# Altium PCB SuperCapCtrl.PcbDoc (part 2 of 2)
Units mil, origin at the board's own origin, x right, y up, seen from the top; angles counter-clockwise.
Board outline 2882.05 x 1582.83 mil, 4 copper layers (Top Layer, Layer 1, Layer 2, Bottom Layer), stack 23.756 mil thick; 102 components, 59 nets, 335 pads, 336 vias.
Unrouted connection lines stored in the file: 2.
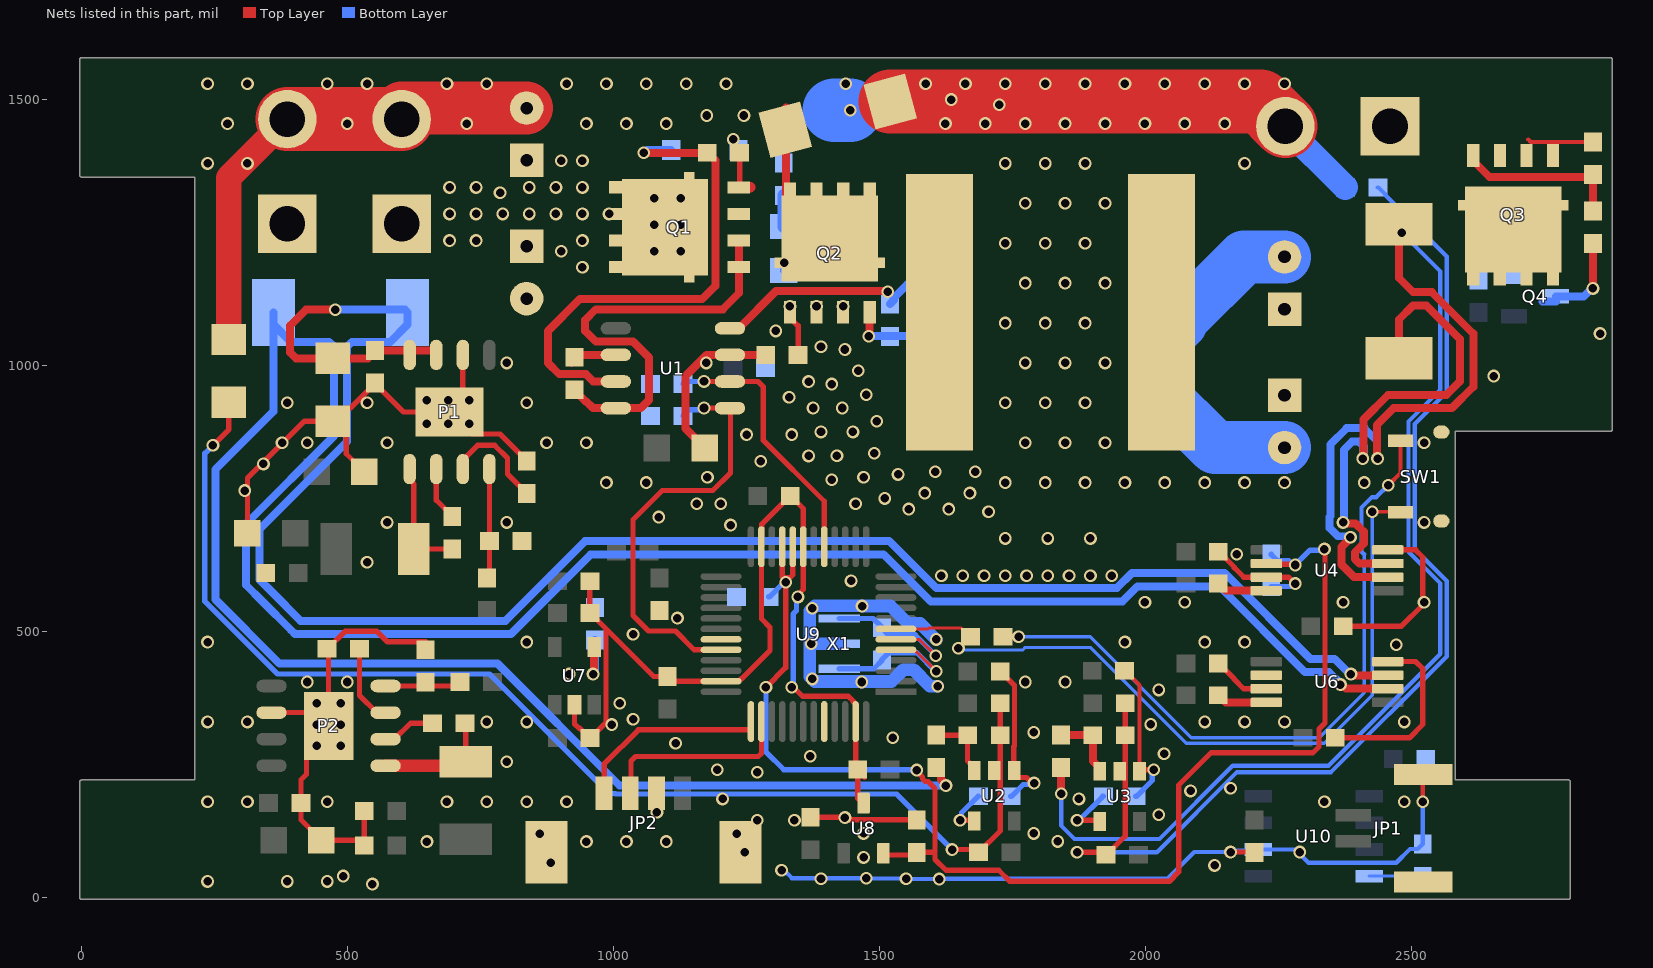
[diagram p4: the nets of this part, all layers, seen from the top]

## Via types
v1: diameter 24, hole 16, Top Layer to Bottom Layer, tented both sides, 336 vias

## Nets (pads, with @x,y where several pads share a name; then routed paths per layer and width w, separated by ;. In a path a pad name is that pad's centre, name@x,y a point inside that pad or via, vN(x,y) a via of type N, cw(c..) or ccw(c..) an arc to the next point about the centre after c; other vN are vias at no path point) (continued)
GND: C1.1 C2.1 C4.1 C5.1 C6.1 C8.1 C11.1 C12.1 C13.1 C15.1 C16.1 C17.1 C18.1 C19.1 C20.1 C21.1 C22.1 C23.1 C24.1 C25.1 C26.1 C27.1 C28.1 C29.1 C30.1 C31.1 C32.2 C33.2 C34.2 C35.2 C36.2 C37.2 C38.2 C39.2 C40.1 C43.2 JP1.0 JP2.0 JP2.3 P1.6 P1.9 P2.6 P2.9 Q4.2 R1.2 R3.2 R7.1 R10.1 R15.2 R20.2 R21.2 R23.2 R24.2 R28.1 R29.1 SW1.1 SW1.SH U1.7 U2.2 U3.2 U4.4 U4.7 U6.4 U6.6 U6.7 U7.2 U8.3 U9.19 U9.23 U9.35 U9.47 U10.2 X1.2 | length 13241
  Top Layer w6: JP2.0@1238.9,65.12 JP2.0@1238.9,84.8 v1(1246.54,84.8) ; C40.1@1732.05,489.8 v1(1761.54,489.8)
  Top Layer w8: v1(2456.54,774.8) 2479.76,798.03 SW1.1@2479.76,858.08 ; v1(2521.54,179.8) 2521.54,230.24 JP1.0@2522.48,231.18
  Top Layer w10: v1(246.54,849.8) 276.54,879.8 R1.2@276.54,930.75 ; C5.1@311.54,684.8 311.54,788.18 418.74,895.39 C1.1@471.54,895.39 ; P2.6@356.75,347.3 439.04,347.3 P2.9@464.04,322.3 ; v1(441.54,364.8) P2.9@464.04,342.3 ; C15.1@531.24,162.3 C16.1@531.24,97.3 521.24,107.3 C12.1@450.68,107.3 412.27,145.72 C13.1@412.27,177.3 412.27,221.03 422.58,231.34 422.58,280.85 P2.9@464.04,322.3 ; C4.1@531.54,799.8 497.39,833.95 497.39,870.86 472.87,895.39 C1.1@471.54,895.39 ; C2.1@551.54,966.86 C2.1@551.54,965.88 ; R10.1@646.54,480.32 574.76,480.32 555.02,500.06 494.98,500.06 462.22,467.3 C21.1@461.24,467.3 464.04,464.51 P2.9@464.04,342.3 ; P1.6@716.54,1019.8 716.54,937.52 P1.9@691.54,912.52 ; C8.1@836.54,820.32 836.54,821.3 786.77,871.06 732.99,871.06 P1.9@691.54,912.52 ; U7.2@926.54,362.1 926.54,326.14 934.84,317.83 936.78,317.83 942.64,311.97 942.64,311.13 954.37,299.4 C22.1@955.36,299.4 956.34,299.4 985.84,328.9 985.84,504.9 ; C24.1@955.36,594.4 955.36,535.39 985.84,504.9 ; C32.2@1101.54,406.22 U9.35@1202.15,406.22 1235.11,406.22 1239.64,410.75 1240.76,410.75 1294.22,464.21 1294.22,507.49 1277.95,523.75 U9.23@1277.95,659.19 1278.39,659.63 1278.39,701.15 1319.33,742.09 1319.33,743.07 1331.06,754.8 C33.2@1332.04,754.8 1333.03,754.8 1356.69,731.14 U9.19@1356.69,659.19 1356.69,578.75 1346.54,568.59 v1(1346.54,564.8) ; C32.2@1101.54,415.31 1075.43,415.31 985.84,504.9 ; v1(1335.04,394.8) 1338.82,394.8 1355.72,377.9 1441.71,377.9 1450.58,369.03 1450.58,367.91 1455.12,363.37 U9.47@1455.12,330.41 C35.2@1455.12,243.86 ; C30.1@1370,150.52 v1@1435,150.52 ; v1@1430,145.52 1565,145.52 C31.1@1570,140.52 ; C35.2@1458.98,240 1458.98,186.14 1470,175.12 U8.3@1470,167.24 ; C35.2@1471.69,225.16 C35.2@1471.69,228.27 ; v1(1636.54,89.8) 1681.02,89.8 C17.1@1686.02,84.8 ; C17.1@1687,84.8 1727.05,124.85 C25.1@1727.05,364.8 ; v1(1871.54,84.8) 1921.02,84.8 C18.1@1926.02,79.8 ; C18.1@1927,79.8 1962.05,114.85 C29.1@1962.05,364.8 ; C26.1@2137.05,439.8 2138.03,439.8 2167.31,410.53 2167.31,409.55 2184.85,392.01 U6.7@2227.36,392.01 ; C28.1@2137.05,649.8 2138.03,649.8 2167.31,620.53 2167.31,619.55 2184.85,602.01 U4.7@2227.36,602.01 2269.21,602.01 2281.42,589.8 v1(2281.54,589.8) ; v1(2160,85) 2204.49,85 C37.2@2205,84.49 ; C20.1@2357.05,299.8 2496.54,299.8 2521.54,324.8 2521.54,429.8 2508.15,443.19 U6.4@2455.71,443.19 ; C19.1@2372.05,509.8 2481.54,509.8 2521.54,549.8 2521.54,639.8 2508.15,653.19 U4.4@2455.71,653.19 ; P2.9@464.04,322.3 P2.9@464.04,342.3 ; C1.1@471.54,895.39 496.06,919.92 505.58,919.92 C2.1@551.54,965.88 ; C2.1@551.54,965.88 604.89,912.52 P1.9@691.54,912.52
  Top Layer w15: C11.1@1171.54,844.8 1135,881.34 1135,980 1174.8,1019.8 R3.2@1280.04,1019.8
  Bottom Layer w6: v1(1761.54,489.8) 1896.54,489.8 2086.54,299.8 2326.54,299.8 2411.54,384.8 2411.54,644.8
  Bottom Layer w8: v1(1315.93,50.94) 1320.26,50.94 1335.2,36 1390,36 v1(1475,36) ; v1@1475.39,35 1475.89,35.5 1549.5,35.5 1550.42,34.58 1611.79,34.58 v1(1612.21,34.16) ; v1@1612.21,34.8 2041.54,34.8 2091.73,85 v1(2160,85) ; v1(1871.54,84.8) 2021.54,84.8 2172.04,235.3 2349.01,235.3 2566.54,452.83 2566.54,594.8 2506.54,654.8 2506.54,889.8 2566.54,949.8 2566.54,1204.8 2526.54,1244.8 2526.54,1245.31 2450.76,1321.09 2450.76,1322.07 2438.03,1334.8 R24.2@2437.04,1334.8 ; v1@2162.4,87.4 2209.8,87.4 U10.2@2212.2,89.8 2281.54,89.8 2306.54,64.8 2471.54,64.8 2497.49,90.76 2511.98,90.76 R21.2@2521.54,100.31 v1(2521.54,179.8) ; 2411.54,644.8 2406.54,649.8 2406.54,733.09 2425.86,752.41 2434.15,752.41 v1(2456.54,774.8)
  Bottom Layer w10: v1(246.54,849.8) 231.54,834.8 231.54,556.47 368.2,419.8 766.54,419.8 991.34,195 1003,195 1003.88,194.12 1532.22,194.12 v1(1636.54,89.8) ; v1(1335.04,394.8) 1337.71,397.48 1337.71,532.8 1343.86,538.95 1343.86,562.12 v1(1346.54,564.8) ; C38.2@2236.54,584.29 2272.24,584.29 2277.75,589.8 v1(2281.54,589.8)
  Bottom Layer w24: v1(1371.54,476.93) X1.2@1424.41,476.93 ; v1(1467.16,547.69) 1520.71,547.69 1553.83,514.57 1576.77,514.57 v1(1606.54,484.8) ; v1@1470.41,548.05 1378.41,548.05 v1(1373.73,543.36) 1369.04,538.67 1369.04,415.18 v1(1373.73,410.5) 1378.41,405.81 1465.53,405.81 v1(1466.54,404.8) 1467.54,405.81 1522.54,405.81 1544.59,427.86 1564.48,427.86 1578.54,413.8 1578.54,413.21 1594.94,396.8 v1(1609.54,396.8)
  other v1: 546.54,24.8 236.54,29.8 386.54,29.8 461.54,29.8 1390,35 1550,35 491.54,39.8 2130,60 881.54,64.8 1470,75 2290,85 649.04,104.8 949.04,104.8 1024.04,104.8 1099.04,104.8 1835,105 861.54,119.8 1231.54,119.8 1470,120 1790,120 1270,145 1340,145 1435,150 2025,155 1081.54,159.8 236.54,179.8 311.54,179.8 461.54,179.8 686.54,179.8 761.54,179.8 836.54,179.8 911.54,179.8 2336.54,179.8 2486.54,179.8 1205,185 1875,185 2085,200 2160,205 1270,235 1195,240 799.04,254.8 1370,265 2035,270 441.54,284.8 486.54,284.8 1116.54,289.8 1525,300 1790,310 441.54,324.8 486.54,324.8 996.54,324.8 2010,325 236.54,329.8 311.54,329.8 761.54,329.8 836.54,329.8 2111.54,329.8 2186.54,329.8 2261.54,329.8 2486.54,329.8 1036.54,334.8 486.54,364.8 1011.54,364.8 2025,390 424.04,404.8 499.04,404.8 1774.04,404.8 1849.04,404.8 916.54,419.8 2471.54,474.8 236.54,479.8 836.54,479.8 1961.54,479.8 2111.54,479.8 2186.54,479.8 1036.54,494.8 1120,525 1999.04,554.8 2074.04,554.8 2371.54,554.8 2524.04,554.8 1446.54,594.8 1616.54,604.8 1656.54,604.8 1696.54,604.8 1736.54,604.8 1776.54,604.8 1816.54,604.8 1856.54,604.8 1896.54,604.8 1936.54,604.8 536.54,629.8 2171.54,644.8 1736.54,674.8 1816.54,674.8 1896.54,674.8 1220,700 574.04,704.8 799.04,704.8 2524.04,704.8 1085,715 1156.54,739.8 1201.54,739.8 306.54,764.8 986.54,779.8 1061.54,779.8 2411.54,779.8 1176.54,789.8 341.54,814.8 1276.54,819.8 376.54,854.8 424.04,854.8 574.04,854.8 874.04,854.8 949.04,854.8 2524.04,854.8 1250,870 649.04,890.02 689.04,890.02 729.04,890.02 386.54,929.8 536.54,929.8 836.54,929.8 649.04,935.02 689.04,935.02 729.04,935.02 2655,980 799.04,1004.8 1174.04,1004.8 2855,1060
HDRV: D1.K R2.2 U1.3 | length 981.6
  Top Layer w15: U1.3@1004.25,969.8 961.73,969.8 948.03,983.5 897.83,983.5 876.54,1004.8 876.54,1064.8 936.54,1124.8 1166.54,1124.8 1191.54,1149.8 1191.54,1385.28 R2.2@1177.01,1399.8 ; v1(1056.54,1399.8) R2.2@1176.03,1399.8
  Bottom Layer w15: v1(1056.54,1399.8) 1058.97,1399.8 1063.97,1404.8 D1.K@1108.15,1404.8
HG: D1.A Q1.G R2.1 | length 141.8
  Top Layer w10: v1(1225,1425) 1225,1411.54 1236.73,1399.8 R2.1@1237.05,1399.8 1237.05,1336.36 1235.69,1335 Q1.G@1235.5,1334.8
  Top Layer w20: Q1.G@1235.69,1335 1257.17,1335
  Bottom Layer w10: v1(1225,1425) 1225,1414.73 D1.A@1234.93,1404.8
IB_N: C1.2 C2.2 C41.1 C42.1 P1.7 P1.8 Q1.D R4.2 U6.3 XT1.1 | length 3581.7
  Top Layer w15: v1(476.54,1104.8) 421.54,1104.8 391.54,1074.8 391.54,1024.8 402.84,1013.5 C1.2@471.54,1013.5 538.14,1013.5 551.54,1026.9 C2.2@551.54,1027.88 662.55,1027.88 666.54,1023.9 P1.7@666.54,1019.8 ; v1(2386.54,419.8) 2388.26,418.08 2394.62,418.08 2395.4,417.3 2455.41,417.3 U6.3@2455.71,417.6
  Bottom Layer w15: v1(476.54,1104.8) 607.52,1104.8 R4.2@612.52,1099.8 612.52,1076.81 580.02,1044.31 507.83,1044.31 499.04,1035.52 499.04,941.7 499.04,856.95 334.21,692.13 334.21,597.13 356.54,574.8 411.54,519.8 796.54,519.8 946.54,669.8 1518.3,669.8 1606.8,581.3 1946.27,581.3 1974.77,609.8 2149.01,609.8 2310.53,448.29 2355.93,448.29 2384.41,419.8 v1(2386.54,419.8)
  other v1: 941.54,1184.8 901.54,1214.8 1076.54,1214.8 1126.54,1214.8 691.54,1234.8 741.54,1234.8 941.54,1234.8 1076.54,1264.8 1126.54,1264.8 691.54,1284.8 741.54,1284.8 791.54,1284.8 841.54,1284.8 891.54,1284.8 941.54,1284.8 991.54,1284.8 1076.54,1314.8 1126.54,1314.8 786.54,1324.8 691.54,1334.8 741.54,1334.8 841.54,1334.8 891.54,1334.8 941.54,1334.8 901.54,1384.8 941.54,1384.8
IB_P: R4.1 R14.1 U6.2 XT2.1 | length 5169
  Top Layer w15: R14.1@1606.06,243.78 1615.77,234.07 1615.77,221.67 1625,212.44 v1(1625,210) ; v1(2366.74,400) 2369.17,400 2376.87,392.3 2455.41,392.3 U6.2@2455.71,392.01
  Bottom Layer w15: R4.1@360.56,1099.8 R4.1@360.56,1076.81 ; v1(1625,210) 1624.38,210.62 1010.72,210.62 781.54,439.8 371.54,439.8 251.54,559.8 251.54,804.8 360.56,913.82 R4.1@360.56,1076.81 ; v1(2366.74,400) 2366.74,402.13 2345.58,423.29 2300.17,423.29 2138.66,584.8 1985.12,584.8 1956.62,556.3 1596.45,556.3 1507.95,644.8 956.89,644.8 806.89,494.8 401.18,494.8 393.86,502.13 338.86,557.13 309.21,586.77 309.21,702.48 474.04,867.31 474.04,952.06 474.04,1035.52 465.25,1044.31 393.06,1044.31 R4.1@360.56,1076.81
IC_N: C9.1 C10.1 L2.2 R6.1 U4.3 | length 1033.3
  Top Layer w15: v1(2371.54,704.8) 2373.26,703.08 2395.02,703.08 2410.6,687.5 2410.6,665.41 2393.71,648.52 2393.71,636.09 2402.5,627.3 2455.41,627.3 U4.3@2455.71,627.6 ; v1(2408.54,824.8) 2410.04,826.3 2410.04,898.3 2456.54,944.8 2566.17,944.8 2591.54,970.17 2591.54,1049.45 2528.18,1112.8 2503.27,1112.8 2476.53,1086.06 R6.1@2476.53,1013.82 ; R6.1@2476.53,992.84 2495.81,992.84 R6.1@2528.31,1025.34
  Bottom Layer w15: v1(2371.54,704.8) 2373.04,706.3 2373.04,841.3 2388.82,857.09 2401.25,857.09 2410.04,848.3 2410.04,826.3 v1(2408.54,824.8)
IC_P: Q3.D R6.2 R19.1 U4.2 | length 3002.7
  Top Layer w15: v1(1841.54,194.8) R19.1@1841.54,244.29 ; v1(2385.6,677.15) 2385.6,675.76 2368.71,658.87 2368.71,625.73 2392.14,602.3 U4.2@2463.03,602.3 ; v1(2436.54,824.8) 2435.04,826.3 2435.04,887.95 2466.89,919.8 2576.52,919.8 2616.54,959.82 2616.54,1059.8 2538.54,1137.8 2503.54,1137.8 2476.54,1164.8 R6.2@2476.54,1249.8
  Bottom Layer w8: v1(1841.54,194.8) 1841.54,134.8 1866.54,109.8 2026.54,109.8 2164.04,247.3 2344.04,247.3 2554.54,457.8 2554.54,589.83 2494.54,649.83 2494.54,894.77 2554.54,954.77 2554.54,1176.8 v1(2481.54,1249.8)
  Bottom Layer w15: v1(2385.6,677.15) 2383.88,678.87 2362.11,678.87 2346.54,694.45 2346.54,715.16 2348.04,716.66 2348.04,851.66 2378.47,882.09 2411.6,882.09 2435.04,858.66 2435.04,826.3 v1(2436.54,824.8)
LDRV: D2.K R8.2 U1.8 | length 437.4
  Top Layer w15: U1.8@1218.82,1069.8 1235.55,1069.8 1305.55,1139.8 1514.54,1139.8 v1(1515.54,1138.8)
  Bottom Layer w15: v1(1515.54,1138.8) R8.2@1527.13,1127.21 ; R8.2@1520,1115.51 1527.13,1122.64 R8.2@1527.13,1127.21 ; D2.K@1596.78,1152.83 1552.75,1152.83 R8.2@1527.13,1127.21
LG: D2.A Q2.G R8.1 | length 174.2
  Top Layer w15: v1(1480,1055) 1480.77,1055.77 1480.77,1099.04 Q2.G@1481.54,1099.8
  Bottom Layer w15: v1(1480,1055) 1566.26,1055 1595.21,1026.05 D2.A@1596.78,1026.05
MSW: C7.1 D3.K L2.1 Q1.S Q2.D Rs.2 U1.4 | length 1188.3
  Top Layer w10: Q1.S@1225.66,1284.8 Q1.S@1235.5,1284.8 Q1.S@1245.33,1284.8 ; L2.1@1555.28,973.44 1612.88,1031.04 L2.1@1612.88,1099.8 L2.1@1626.54,1113.46
  Top Layer w15: C7.1@926.54,954.29 926.54,953.3 946.65,933.19 947.63,933.19 961.02,919.8 U1.4@1004.25,919.8 1051.54,919.8 1066.54,934.8 1066.54,1014.8 1036.54,1044.8 966.54,1044.8 946.54,1064.8 946.54,1085.66 966.54,1105.66 1205.31,1105.66 1235.5,1135.84 Q1.S@1235.5,1184.8 Q1.S@1235.5,1234.8 ; Q2.D@1324.52,1311.97 D3.K@1324.52,1484.8
  Bottom Layer w15: Rs.2@1320,1178.66 1321.14,1179.8 v1(1321.14,1193.1)
NetC3_1: C3.1 L1.1 P1.1 | length 225.8
  Top Layer w10: P1.1@616.54,805.24 616.54,784.82 624.37,776.98 L1.1@624.37,654.8 C3.1@696.54,654.8
NetC3_2: C3.2 P1.2 | length 101.8
  Top Layer w10: P1.2@666.54,805.24 666.54,746.81 696.54,716.81 C3.2@696.54,715.83
NetC7_2: C7.2 U1.2 | length 93.6
  Top Layer w8: C7.2@921.54,1000.83 921.54,1001.81 C7.2@930.79,1011.06
  Top Layer w15: C7.2@926.54,1015.31 931.03,1019.8 U1.2@1004.25,1019.8
NetC8_2: C8.2 P1.3 | length 203.6
  Top Layer w10: P1.3@716.54,805.24 716.54,821.97 744.37,849.8 776.54,849.8 800.67,825.67 800.67,796.15 836.54,760.28 C8.2@836.54,759.29
NetC14_1: C14.1 L3.1 P2.1 | length 220.7
  Top Layer w10: C14.1@720.77,327.3 721.75,326.32 L3.1@721.75,255.14
  Top Layer w24: P2.1@571.32,247.3 571.51,247.49 714.11,247.49 L3.1@717.84,251.22
NetC14_2: C14.2 P2.2 | length 100.9
  Top Layer w10: P2.2@571.32,297.3 588.05,297.3 618.05,327.3 C14.2@659.74,327.3
NetC21_2: C21.2 P2.3 | length 150.1
  Top Layer w10: C21.2@522.26,467.3 522.26,379.63 554.59,347.3 P2.3@571.32,347.3
NetC27_2: C27.2 U7.4 | length 117
  Top Layer w15: v1(961.54,419.8) 962.74,421 962.74,469.17 U7.4@963.94,470.37
  Bottom Layer w15: v1(961.54,419.8) 961.54,422.24 964.84,425.55 C27.2@964.84,483.89
NetC40_2: C40.2 SW1.2 U9.7 | length 1469.9
  Top Layer w6: U9.7@1530.92,504.65 1590.79,504.65 1592.32,506.17 1653.67,506.17 C40.2@1670.04,489.8 ; v1(1648.49,468.25) C40.2@1670.04,489.8 ; C40.2@1671.03,489.8 C40.2@1670.04,489.8 ; v1(2426.54,724.8) 2479.18,724.8 SW1.2@2479.76,724.22
  Bottom Layer w6: v1(1648.49,468.25) 1651.93,464.8 1768.97,464.8 1773.97,469.8 1896.54,469.8 2076.54,289.8 2336.54,289.8 2426.54,379.8 v1(2426.54,724.8)
NetCs_1: Cs.1 Rs.1 | length 58.1
  Bottom Layer w24: Rs.1@1320,1261.34 Cs.1@1320,1319.48
NetP1_4: P1.4 R5.1 R7.2 | length 206.8
  Top Layer w10: R5.1@762.04,600.32 766.54,604.81 R7.2@766.54,669.8 P1.4@766.54,805.24
NetP2_4: P2.4 R9.1 R10.2 | length 142.8
  Top Layer w10: P2.4@571.32,397.3 703.52,397.3 R9.1@711.02,404.8
NetQ3_G: Q3.G R25.1 R26.2 | length 318.2
  Top Layer w15: Q3.G@2616.54,1394.8 2616.54,1384.97 2646.7,1354.8 2837.05,1354.8 R25.1@2841.54,1359.29 R26.2@2841.54,1290.31
NetQ4_3: Q4.3 R26.1 | length 185.3
  Top Layer w15: v1(2841.54,1144.8) R26.1@2841.54,1229.29
  Bottom Layer w15: 2746.93,1119.89 Q4.3@2771.93,1119.89 ; Q4.3@2771.93,1129.89 2824.19,1129.89 2839.1,1144.8 v1(2841.54,1144.8)
NetR11_1: R11.1 R12.2 U2.1 | length 379
  Top Layer w8: R12.2@1727.04,424.8 1728.03,424.8 1753.23,399.6 ; U2.1@1753.23,238.09 1753.23,283.3
  Top Layer w10: R12.2@1728.15,424.68 1739.76,413.07 1739.76,412.44 1753.77,398.43 1753.77,284.35 1752.72,283.3 U2.1@1752.72,238.6 ; U2.1@1755.6,234.8 1755.6,229.81 1760.04,225.37 1776.18,225.37 1786.75,214.8 v1(1790.54,214.8)
  Bottom Layer w10: R11.1@1747.05,189.8 1748.03,189.8 1770.36,212.12 1787.86,212.12 v1(1790.54,214.8)
NetR11_2: R11.2 U2.4 | length 86.5
  Top Layer w10: v1@1651.66,144.68 1651.78,144.8 1676.59,144.8 U2.4@1677.79,143.6
  Bottom Layer w10: v1(1651.54,144.8) 1654.21,147.48 1654.21,158.97 1685.04,189.8 R11.2@1686.03,189.8
NetR13_2: R13.2 U6.8 | length 95.9
  Top Layer w15: R13.2@2137.04,379.8 2138.03,379.8 2151.41,366.42 U6.8@2227.36,366.42
NetR14_2: R14.2 R15.1 U2.3 | length 130.3
  Top Layer w10: R14.2@1606.54,304.68 R15.1@1665.9,304.68 ; R15.1@1665.51,304.29 1665.51,256.66 1671.37,250.8 1671.61,250.8 1677.92,244.5 U2.3@1677.92,238.6
NetR16_1: R16.1 R18.2 U3.1 | length 293.2
  Top Layer w8: R18.2@1960.97,425.88 1961.96,425.88 1988.94,398.9 U3.1@1988.94,237.05
  Top Layer w10: U3.1@1988.94,237.05 1991.69,239.8 v1(2015.54,239.8)
  Bottom Layer w10: R16.1@1982.05,189.8 1983.03,189.8 2012.86,219.63 2012.86,237.12 v1(2015.54,239.8)
NetR16_2: R16.2 U3.4 | length 111.7
  Top Layer w10: v1(1871.54,144.8) 1911.89,144.8 U3.4@1914.13,142.56
  Bottom Layer w10: v1(1871.54,144.8) 1875.04,144.8 1920.04,189.8 R16.2@1921.03,189.8
NetR17_2: R17.2 U4.8 | length 95.9
  Top Layer w15: R17.2@2137.04,589.8 2138.03,589.8 2151.41,576.42 U4.8@2227.36,576.42
NetR19_2: R19.2 R20.1 U3.3 | length 132.9
  Top Layer w15: R19.2@1841.54,305.31 1841.79,305.06 1900.77,305.06 R20.1@1901.02,304.8 1901.02,256.07 1914.13,242.95 U3.3@1914.13,237.05
NetR21_1: R21.1 U10.8 | length 100.9
  Bottom Layer w6: U10.8@2420.87,39.8 2521.02,39.8 R21.1@2521.54,39.29
NetR27_1: R27.1 U9.5 X1.1 | length 302.6
  Top Layer w6: U9.5@1530.92,465.28 1564.97,465.28 1568.12,462.12 1569.21,462.12 v1(1606.54,424.8)
  Bottom Layer w10: X1.1@1424.41,429.69 1489.23,429.69 1504.43,444.88 R27.1@1504.43,445.87 1504.43,446.85 1516.16,458.58 1517.15,458.58 1518.37,459.8 1570.18,459.8 1605.18,424.8 v1(1606.54,424.8)
NetR27_2: R27.2 U9.6 X1.3 | length 299.5
  Top Layer w6: U9.6@1530.92,484.96 1531.37,484.52 1575.16,484.52 v1(1605.64,454.04)
  Bottom Layer w10: X1.3@1424.41,524.17 1488.13,524.17 1504.43,507.88 R27.2@1504.43,506.89 1504.43,505.91 1516.16,494.17 1517.15,494.17 1517.76,493.57 1567.11,493.57 1605.64,455.04 v1(1605.64,454.04)
PGND: C9.2 C10.2 C41.2 C42.2 Cs.2 D3.A Q2.S R1.1 R3.1 R24.1 XT1.2 XT2.2 XT3.2 | length 2636.7
  Top Layer w10: Q2.S@1331.54,1099.8 1331.54,1089.97 1347.05,1074.46 R3.1@1347.05,1019.8 ; C9.2@2261.54,845.59 C9.2@2270.75,845.59
  Top Layer w48: R1.1@276.54,1048.86 276.54,1353.23 XT2.2@386.54,1463.23
  Top Layer w100: XT1.2@601.54,1484.02 C42.2@836.54,1484.02
  Top Layer w120: XT2.2@386.54,1463.23 XT1.2@601.54,1463.23 ; D3.A@1520.08,1496.21 2216.71,1496.21 XT3.2@2263.11,1449.8
  Bottom Layer w48: XT3.2@2263.11,1449.8 2263.11,1447.71 R24.1@2376.02,1334.8
  Bottom Layer w100: C9.2@2261.54,845.59 2130.75,845.59 2022.96,953.38 2022.96,1036.22 2066.54,1079.8 2066.54,1084.8 2185.75,1204.02 C10.2@2261.54,1204.02
  Bottom Layer w120: 1415,1480 v1(1445,1480)
  other v1: 1705,725 1555,730 1630,730 1455,740 1510,750 1585,760 1670,760 1736.54,779.8 1811.54,779.8 1886.54,779.8 1961.54,779.8 2036.54,779.8 2111.54,779.8 2186.54,779.8 2261.54,779.8 1410,785 1470,790 1535,795 1605,800 1680,800 1366.54,829.8 1420,830 1490,835 1774.04,854.8 1849.04,854.8 1924.04,854.8 1335,870 1390,875 1450,875 1495,895 1375,920 1430,920 1736.54,929.8 1811.54,929.8 1886.54,929.8 1330,940 1475,945 1410,965 1366.54,969.8 1460,990 1774.04,1004.8 1849.04,1004.8 1924.04,1004.8 1435,1030 1390,1035 1305,1065 1736.54,1079.8 1811.54,1079.8 1886.54,1079.8 1331.54,1111 1381.54,1111 1431.54,1111 1774.04,1154.8 1849.04,1154.8 1924.04,1154.8 1736.54,1229.8 1811.54,1229.8 1886.54,1229.8 1774.04,1304.8 1849.04,1304.8 1924.04,1304.8 236.54,1379.8 311.54,1379.8 1736.54,1379.8 1811.54,1379.8 1886.54,1379.8 2186.54,1379.8 274.04,1454.8 499.04,1454.8 724.04,1454.8 949.04,1454.8 1024.04,1454.8 1099.04,1454.8 1624.04,1454.8 1699.04,1454.8 1774.04,1454.8 1849.04,1454.8 1924.04,1454.8 1999.04,1454.8 2074.04,1454.8 2149.04,1454.8 1175,1470 1245,1470 1725,1490 1635,1500 236.54,1529.8 311.54,1529.8 461.54,1529.8 536.54,1529.8 686.54,1529.8 761.54,1529.8 911.54,1529.8 986.54,1529.8 1061.54,1529.8 1136.54,1529.8 1211.54,1529.8 1436.54,1529.8 1586.54,1529.8 1661.54,1529.8 1736.54,1529.8 1811.54,1529.8 1886.54,1529.8 1961.54,1529.8 2036.54,1529.8 2111.54,1529.8 2186.54,1529.8 2261.54,1529.8
REF3V3: C31.2 C34.1 C38.1 U4.6 U8.2 U9.20 U9.21 | length 2587
  Top Layer w10: v1(1286.54,394.8) 1323.52,431.79 1323.52,596.16 1317.32,602.37 U9.21@1317.32,659.19 ; v1@1323.52,600.54 1331.15,600.54 1337.01,606.4 U9.20@1337.01,659.19 ; U8.2@1507.4,82.76 1510.67,79.49 C31.2@1570,79.49 ; C31.2@1570,84.49 1604.49,84.49 1604.49,204.63 1591.55,217.57 1586.08,217.57 1580.8,222.84 1580.8,226.26 1570,237.07 v1(1570,239.12) ; 1604.49,79.49 1604.49,71.34 1625.06,50.77 1724.23,50.77 1745,30 2045,30 2062.44,47.44 2062.44,210.71 2123.54,271.8 2315.2,271.8 2326.47,283.07 2326.47,316.4 2337.74,327.67 2337.74,653.6 v1(2336.54,654.8) ; U4.6@2227.36,627.6 2250.49,627.6 2251.89,626.2 2280.14,626.2 v1(2281.54,624.8)
  Bottom Layer w10: v1(1286.54,394.8) 1286.54,273.46 1320.2,239.8 1560.2,239.8 1563.2,236.8 1567.32,236.8 v1@1570,234.12 ; C34.1@1292.05,564.8 1293.03,564.8 1320.61,592.38 v1(1323.52,592.38) ; C38.1@2236.54,645.32 2236.54,644.33 2248.27,632.6 2269.95,632.6 2277.75,624.8 v1(2281.54,624.8) 2309.54,652.8 2334.54,652.8 v1(2336.54,654.8)
SWCLK: JP2.2 U9.38 | length 357.1
  Top Layer w10: JP2.2@1031.39,210.46 1032.83,211.9 1032.83,256.09 1041.54,264.8 1272.09,264.8 1277.95,270.66 U9.38@1277.95,330.41
SWDIO: JP2.1 U9.37 | length 357.7
  Top Layer w10: JP2.1@982.17,210.46 982.17,250.44 1046.54,314.8 1257.2,314.8 1258.27,315.87 U9.37@1258.27,330.41
T1C3: R28.2 U1.5 U9.32 | length 808.9
  Top Layer w10: v1(1170,920) 1170.1,919.9 1218.72,919.9 1219.78,918.84 1219.78,798.05 1186.54,764.8 1091.54,764.8 1036.54,709.8 1036.54,529.8 1065.67,500.67 1116.21,500.67 1151.6,465.28 U9.32@1202.15,465.28
  Bottom Layer w10: R28.2@1130.51,905 1142.24,916.73 1162.94,916.73 1166.21,920 v1(1170,920)
T1C3N: R29.2 U1.6 U9.17 | length 505.4
  Top Layer w10: v1(1170,970) 1170.1,969.9 1218.72,969.9 U1.6@1218.82,969.8 1271.54,969.8 1281.54,959.8 1281.54,859.26 1396.06,744.73 U9.17@1396.06,659.19
  Bottom Layer w10: R29.2@1130.51,965 1135.51,970 v1(1170,970)
U_RX: U9.44
U_TX: U9.31
VCAP: Q3.S R25.2 XT3.1 | length 123.5
  Top Layer w8: 2720,1425 2724.69,1420.31 R25.2@2841.54,1420.31
pads on no net: P1.5 P2.5 U4.1 U6.1 U9.3 U9.4 U9.13 U9.14 U9.15 U9.16 U9.18 U9.22 U9.25 U9.26 U9.27 U9.29 U9.30 U9.34 U9.39 U9.40 U9.41 U9.42 U9.43

## Polygon pours and split planes (outlines as drawn)
GND on Bottom Layer "GND_L04_P006" (solid, remove dead copper, pour order 6): 2878.03,1574.8 2878.03,875.98 2578.74,875.98 2578.74,0 216.54,0 216.54,1574.8
PGND on Bottom Layer "PGND_L04_P005" (solid, pour order 5): 1431.54,1024.99 1431.54,839.8 1466.54,804.8 2326.54,804.8 2326.54,1024.99 2574.69,1024.99 2581.54,1031.84 2581.54,1574.8 216.54,1574.8 216.54,1024.99
GND on Top Layer "GND_L01_P010" (solid, remove dead copper, pour order 10): 2878.03,1574.8 2878.03,875.98 2578.74,875.98 2578.74,0 216.54,0 216.54,1574.8
PGND on Top Layer "PGND_L01_P003" (solid, pour order 3): 1310,1024.99 1310,850 1455,705 2326.54,705 2326.54,1024.99 2574.69,1024.99 2581.54,1031.84 2581.54,1574.8 216.54,1574.8 216.54,1024.99
PGND on Layer 1 "PGND_L02_P009" (solid, pour order 9): 1310,1024.99 1310,850 1455,705 2326.54,705 2326.54,1024.99 2574.69,1024.99 2581.54,1031.84 2581.54,1574.8 216.54,1574.8 216.54,1024.99
GND on Layer 1 "GND_L02_P008" (solid, remove dead copper, pour order 8): 2878.03,1574.8 2878.03,875.98 2578.74,875.98 2578.74,0 216.54,0 216.54,1574.8
PGND on Layer 2 "PGND_L03_P007" (solid, pour order 7): 1310,1024.99 1310,850 1455,705 2326.54,705 2326.54,1024.99 2574.69,1024.99 2581.54,1031.84 2581.54,1574.8 216.54,1574.8 216.54,1024.99
GND on Layer 2 "GND_L03_P004" (solid, remove dead copper, pour order 4): 2878.03,1574.8 2878.03,875.98 2578.74,875.98 2578.74,0 216.54,0 216.54,1574.8

## Other copper
Top Layer:
  region net MSW: 1206.54,1304.8 1251.54,1304.8 1271.54,1324.8 1271.54,1479.8 1301.54,1509.8 1371.54,1509.8 1516.54,1364.8 1676.54,1364.8 1676.54,839.8 1671.54,834.8 1546.54,834.8 1531.54,849.8 1531.54,1154.8 1306.54,1154.8 1296.54,1164.8 1206.54,1164.8
  region net NetQ4_3: 2822.5,1103.84 2822.5,1157.5 2857.5,1157.5 2872.5,1142.5 2872.5,1117.5 2859.24,1104.24
  region net PGND: 1410,755 1410,730 1435.2,704.8 1460.2,704.8 2281.54,704.8 2326.54,749.8 2326.54,889.8 2221.54,889.8 2151.54,819.8 1946.54,819.8 1946.54,1379.8 1961.54,1394.8 2141.54,1394.8 2196.54,1339.8 2316.54,1339.8 2341.54,1364.8 2341.54,1489.8 2266.54,1564.8 1556.54,1564.8 1556.54,1434.8 1606.54,1384.8 1696.54,1384.8 1696.54,819.8 1540,819.8 1520,840 1520,975 1460,1035 1460,1124.8 1311.54,1124.8 1286.54,1099.8 1286.54,1059.8 1311.54,1034.8 1311.54,1004.8 1311.54,853.46
  region net PGND: 1294.45,1515 1265,1485.55 1265,1460 1250,1445 1215,1445 1199.8,1429.8 716.54,1429.8 671.54,1384.8 361.54,1384.8 306.54,1329.8 216.54,1329.8 216.54,1569.8 1551.54,1569.8 1556.54,1564.8 1606.54,1384.8 1510.2,1384.8 1380,1515
  region net VCAP: 2386.54,1514.8 2416.54,1544.8 2751.54,1544.8 2796.54,1499.8 2796.54,1369.8 2651.54,1369.8 2636.54,1384.8 2636.54,1419.8 2631.54,1424.8 2601.54,1424.8 2596.54,1419.8 2596.54,1399.8 2581.54,1384.8 2386.54,1384.8
  region net IC_P: 2411.54,1214.8 2446.54,1179.8 2516.54,1179.8 2556.54,1139.8 2781.54,1139.8 2806.54,1164.8 2806.54,1329.8 2796.54,1339.8 2446.54,1339.8 2411.54,1304.8
  region net IB_N: 511.54,1369.8 681.54,1369.8 731.54,1419.8 966.54,1419.8 1016.54,1369.8 1156.54,1369.8 1176.54,1349.8 1176.54,1169.8 1156.54,1149.8 896.54,1149.8 866.54,1179.8 686.54,1179.8 511.54,1179.8
  region net IC_N: 2518.52,1057.82 2541.54,1057.82 2541.54,1034.8 2541.54,969.8 2416.54,969.8 2341.54,894.8 2216.54,894.8 2161.54,839.8 1956.54,839.8 1956.54,1369.8 2101.54,1369.8 2191.54,1279.8 2191.54,1189.8 2231.54,1149.8 2426.54,1149.8
  region net 12V0: 446.54,604.8 446.54,744.8 416.54,774.8 416.54,824.8 466.54,824.8 491.54,799.8 491.54,729.8 511.54,709.8 511.54,604.8
  region net 12V0: 416.54,824.8 371.54,779.8 371.54,639.8 386.54,624.8 386.54,589.8 426.54,589.8 431.54,594.8 431.54,744.8 456.54,769.8
Bottom Layer:
  region net PGND: 1311.54,1124.8 1286.54,1099.8 1286.54,1059.8 1311.54,1034.8 1311.54,1004.8 1311.54,859.8 1466.54,704.8 2281.54,704.8 2326.54,749.8 2326.54,889.8 2221.54,889.8 2151.54,819.8 1961.54,819.8 1961.54,1394.8 2141.54,1394.8 2196.54,1339.8 2316.54,1339.8 2341.54,1364.8 2341.54,1489.8 2266.54,1564.8 1556.54,1564.8 1556.54,1434.8 1606.54,1384.8 1696.54,1384.8 1696.54,819.8 1486.54,819.8 1446.54,859.8 1446.54,1124.8
  pour cut-out: 1531.54,564.8 1561.54,534.8 1581.54,534.8 1625.54,490.8 1625.54,387.98 1624.71,387.98 1616.54,379.8 1591.54,379.8 1559.77,411.57 1550.48,411.57 1528.71,389.8 1371.54,389.8 1351.54,409.8 1351.54,544.8 1371.54,564.8
  region net IB_N: 511.54,1039.8 649.53,1039.8 656.52,1032.81 816.54,1192.83 816.54,1249.8 511.54,1249.8
  region net IB_P: 269.32,1032.02 241.54,1059.8 241.54,1289.8 291.54,1339.8 456.54,1339.8 476.54,1319.8 476.54,1159.8 436.54,1119.8 436.54,1034.8
  region net IB_N: 511.54,1369.8 681.54,1369.8 731.54,1419.8 966.54,1419.8 1016.54,1369.8 1156.54,1369.8 1176.54,1349.8 1176.54,1169.8 1156.54,1149.8 896.54,1149.8 866.54,1179.8 686.54,1179.8 511.54,1179.8

## Silkscreen, mask and mechanical layers (free items; w line width, h text height)
Top Solder:
  region: 1220,1346.24 1267.21,1346.24 1267.21,1323.2 1220,1323.2
  region: 1621.34,1558.75 1695,1558.75 1695,1521.25 1682.5,1508.75 1635,1508.75 1621.74,1522.01
  region: 1173.17,1560 1246.83,1560 1246.83,1522.5 1234.33,1510 1186.83,1510 1173.57,1523.26
  region: 2822.5,1103.84 2822.5,1157.5 2857.5,1157.5 2872.5,1142.5 2872.5,1117.5 2859.24,1104.24
Mechanical 1:
  circle w10: c2755.91,984.25 r62.99
  circle w10: c2677.17,108.27 r62.99
  circle w10: c118.11,1466.54 r62.99
  circle w10: c118.11,108.27 r62.99
  lines w8: 309.8,1574.8 2578.74,1574.8 ; 216.54,1574.8 0,1574.8 0,1358.27 216.54,1358.27 216.54,216.54 0,216.54 0,0 261.34,0 2578.74,0 2795.28,0 2795.28,216.54 2578.74,216.54 2578.74,880 2874.02,880 2874.02,1509.8 2874.02,1574.8 2821.54,1574.8 2578.74,1574.8 ; 216.54,1574.8 2578.74,1574.8 ; 216.54,1574.8 2578.74,1574.8

## Text inside footprints (layer, text, board x,y; h text height)
C9: Top Overlay "+" at 2296.2,981.8 h50 r270
C10: Top Overlay "+" at 2226.87,1067.8 h50 r90
C41: Top Overlay "+" at 871.2,1261.8 h50 r270
C42: Top Overlay "+" at 801.87,1347.8 h50 r90